# Altium PCB PCI Express Mini_3000X5095_52PIN_Full-Mini-Type F1.PCBDOC (part 6 of 7)
Units mm, origin at the board's own origin, x right, y up, seen from the top; angles counter-clockwise.
Board outline 70 x 83.2 mm, 6 copper layers (TopLayer, Layer 1, Layer 2, Layer 3, Layer 4, Bottom Layer), stack 1.013 mm thick; 332 components, 213 nets, 1105 pads, 528 vias.
Unrouted connection lines stored in the file: 10.
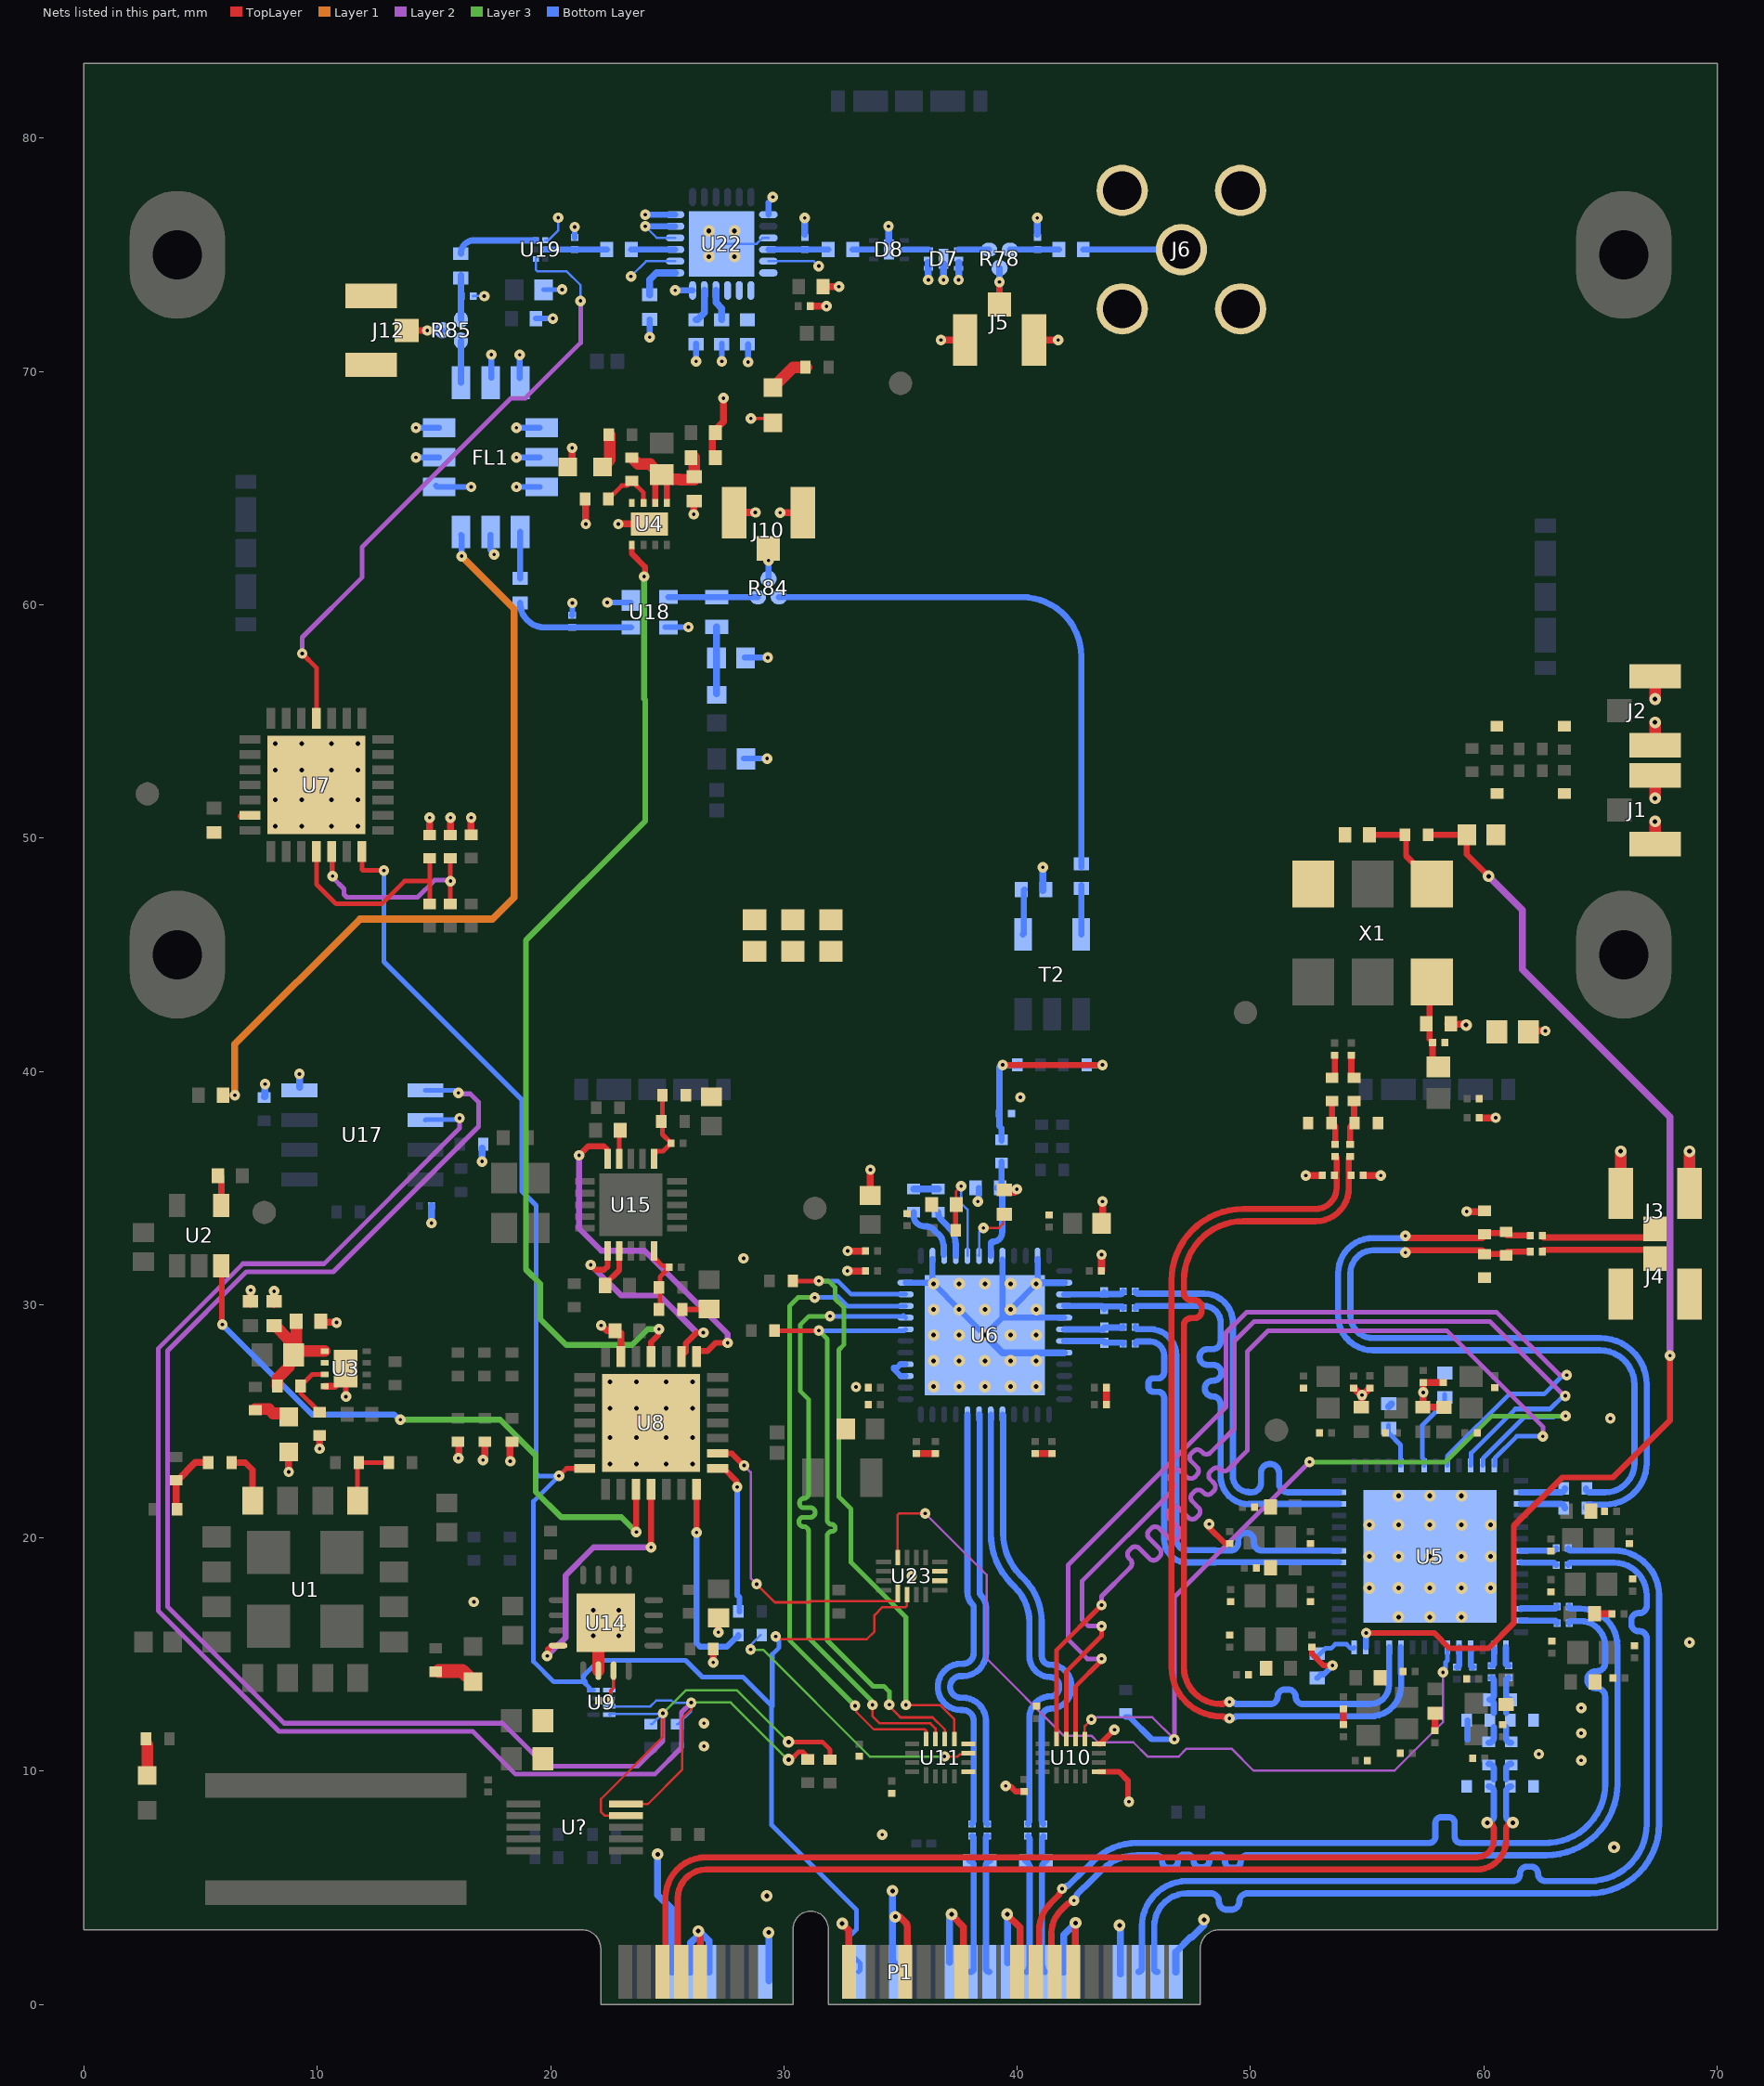
[diagram p7: the nets of this part, all layers, seen from the top]

## Via types
v1: diameter 0.45, hole 0.15, TopLayer to Bottom Layer, tented both sides, 263 vias
v2: diameter 0.5, hole 0.2, TopLayer to Bottom Layer, tented both sides, 200 vias
v3: diameter 0.5, hole 0.2, TopLayer to Bottom Layer, 36 vias
v4: diameter 0.45, hole 0.15, TopLayer to Bottom Layer, 29 vias

## Nets (pads, with @x,y where several pads share a name; then routed paths per layer and width w, separated by ;. In a path a pad name is that pad's centre, name@x,y a point inside that pad or via, vN(x,y) a via of type N, cw(c..) or ccw(c..) an arc to the next point about the centre after c; other vN are vias at no path point) (continued)
CLKin1_N: P1.5 R37.1 R39.1 | length 43.7
  TopLayer w0.267: P1.5@24.8,1.4 ccw(c24.8,1.526) 24.926,1.526 24.926,4.569 cw(c26.668,4.569) 26.668,6.311 59.69,6.311 ccw(c59.69,7.052) 60.431,7.052 60.431,7.511 ccw(c60.145,7.511) v2(60.145,7.798)
  Bottom Layer w0.267: v2(60.145,7.798) ccw(c60.145,8.084) 60.431,8.084 60.431,9.125 ccw(c60.21,9.125) R37.1@60.21,9.347 ; R39.1@60.21,10.316 cw(c60.21,10.096) 60.429,10.096 60.429,9.647
CLKin1_P: P1.7 R31.1 R32.2 | length 43.7
  TopLayer w0.267: P1.7@25.6,1.4 cw(c25.6,1.547) 25.453,1.547 25.453,4.569 cw(c26.668,4.569) 26.668,5.784 59.69,5.784 ccw(c59.69,7.052) 60.958,7.052 60.958,7.511 cw(c61.245,7.511) v2(61.245,7.798)
  Bottom Layer w0.267: 60.956,9.647 60.956,10.096 cw(c61.176,10.096) R31.1@61.176,10.316 ; R32.2@61.18,9.347 ccw(c61.18,9.125) 60.958,9.125 60.958,8.084 ccw(c61.245,8.084) v2(61.245,7.798)
CLKin1P_N: C59.2 R34.1 R38.1 R39.2 | length 2.6
  Bottom Layer w0.267: R39.2@60.21,11.216 ccw(c60.21,11.435) 60.429,11.435 60.429,11.889 ; C59.2@60.323,13.999 cw(c60.323,13.893) 60.429,13.893 60.429,13.253 cw(c60.243,13.253) 60.243,13.066 cw(c60.243,12.88) 60.429,12.88 60.429,12.489
CLKin1P_P: C54.2 R31.2 R33.2 R34.2 | length 2.6
  Bottom Layer w0.267: 60.956,11.889 60.956,11.435 ccw(c61.176,11.435) R31.2@61.176,11.216 ; 60.956,12.489 60.956,12.88 cw(c61.143,12.88) 61.143,13.066 cw(c61.143,13.253) 60.956,13.253 60.956,13.893 cw(c61.063,13.893) C54.2@61.063,13.999
CLKout1_C2_N: C58.1 J4.2 | length 5.1
  TopLayer w0.267: C58.1@62.504,32.272 cw(c62.579,32.272) 62.579,32.348 66.97,32.348 cw(c66.97,31.978) J4.2@67.34,31.978
CLKout1_C2_P: C57.1 J3.2 | length 5.1
  TopLayer w0.267: C57.1@62.507,32.964 ccw(c62.595,32.964) 62.595,32.875 66.97,32.875 ccw(c66.97,33.245) J3.2@67.34,33.245
CLKout1_C_N: C58.2 R36.2 R41.2 R42.2 | length 31.7
  TopLayer w0.267: R42.2@60.093,32.168 60.955,32.168 cw(c61.059,32.168) 61.059,32.272 C58.2@61.984,32.272
  TopLayer w0.268: v1(56.642,32.235) cw(c56.733,32.235) 56.733,32.326 59.873,32.326 cw(c59.873,32.162) R42.2@60.037,32.162
  Bottom Layer w0.267: 55.255,32.327 ccw(c55.255,31.354) 54.282,31.354 54.282,29.529 ccw(c55.244,29.529) 55.244,28.567 64.984,28.567 cw(c64.984,26.567) 66.984,26.567 66.984,23.209 cw(c65.204,23.209) 65.204,21.429 64.529,21.429 ccw(c64.529,21.274) R36.2@64.374,21.274
  Bottom Layer w0.268: 55.255,32.327 56.55,32.327 cw(c56.55,32.235) v1(56.642,32.235)
CLKout1_C_P: C57.2 R35.2 R40.2 R41.1 | length 31.8
  TopLayer w0.267: R40.2@60.037,33.068 60.955,33.068 ccw(c61.06,33.068) 61.06,32.964 C57.2@61.987,32.964
  TopLayer w0.268: v1(56.642,32.945) ccw(c56.733,32.945) 56.733,32.854 59.873,32.854 ccw(c59.873,33.018) R40.2@60.037,33.018
  Bottom Layer w0.267: 55.255,32.854 ccw(c55.255,31.354) 53.755,31.354 53.755,29.529 ccw(c55.244,29.529) 55.244,28.04 64.984,28.04 cw(c64.984,26.567) 66.457,26.567 66.457,23.209 cw(c65.204,23.209) 65.204,21.956 64.541,21.956 cw(c64.541,22.124) R35.2@64.374,22.124
  Bottom Layer w0.268: 55.255,32.854 56.55,32.854 ccw(c56.55,32.945) v1(56.642,32.945)
CLKout1_N: R36.1 U5.17 | length 2
  Bottom Layer w0.267: U5.17@61.593,21.456 63.291,21.456 cw(c63.291,21.274) R36.1@63.474,21.274
CLKout1_P: R35.1 U5.16 | length 2
  Bottom Layer w0.267: U5.16@61.593,21.956 63.306,21.956 ccw(c63.306,22.124) R35.1@63.474,22.124
CLKout3_C_N: C51.1 P1.48 | length 41.7
  Bottom Layer w0.267: P1.48@45.2,1.4 ccw(c45.2,1.545) 45.345,1.545 45.345,3.353 cw(c47.284,3.353) 47.284,5.292 61.109,5.292 61.242,5.292 ccw(c61.242,5.602) 61.552,5.602 cw(c61.862,5.602) 61.862,5.912 62.017,5.912 cw(c62.017,5.602) 62.327,5.602 ccw(c62.637,5.602) 62.637,5.292 64.541,5.292 ccw(c64.541,7.734) 66.984,7.734 66.984,15.561 66.984,15.695 ccw(c66.674,15.695) 66.674,16.005 66.635,16.005 cw(c66.635,16.315) 66.325,16.315 66.325,16.47 cw(c66.635,16.47) 66.635,16.78 66.674,16.78 ccw(c66.674,17.09) 66.984,17.09 66.984,17.533 ccw(c65.581,17.533) 65.581,18.936 63.72,18.936 ccw(c63.72,18.839) C51.1@63.624,18.839
CLKout3_C_P: C50.1 P1.50 | length 41.8
  Bottom Layer w0.267: P1.50@46,1.4 cw(c46,1.528) 45.872,1.528 45.872,3.353 cw(c47.284,3.353) 47.284,4.765 48.295,4.765 cw(c48.295,4.414) 48.645,4.414 ccw(c48.996,4.414) 48.996,4.064 49.171,4.064 ccw(c49.171,4.414) 49.522,4.414 cw(c49.872,4.414) 49.872,4.765 55.063,4.765 64.541,4.765 ccw(c64.541,7.734) 67.511,7.734 67.511,17.533 ccw(c65.581,17.533) 65.581,19.463 63.72,19.463 cw(c63.72,19.559) C50.1@63.624,19.559
CLKout3_N: C51.2 U5.22 | length 1.6
  Bottom Layer w0.267: U5.22@61.593,18.956 61.613,18.936 62.436,18.936 62.439,18.939 62.95,18.939 cw(c62.95,18.786) 63.059,18.895 63.104,18.849 C51.2@63.104,18.839
CLKout3_P: C50.2 U5.21 | length 1.6
  Bottom Layer w0.267: U5.21@61.593,19.456 62.22,19.456 62.224,19.46 62.95,19.46 ccw(c62.95,19.613) 63.059,19.504 63.104,19.549 C50.2@63.104,19.559
CLKout5_C_N: C192.1 P1.39 | length 39.9
  TopLayer w0.267: P1.39@41.6,1.4 cw(c41.93,1.73) 41.464,1.73 41.464,3.047 cw(c42.848,3.047) 41.869,4.026 42.15,4.307 cw(c42.218,4.239) 42.218,4.335
  Bottom Layer w0.267: v1(42.431,4.459) cw(c42.551,4.459) 42.466,4.543 v1@42.526,4.604 ; v1@42.526,4.604 ccw(c42.458,4.672) 42.555,4.672 cw(c42.651,4.672) 42.583,4.74 42.867,5.024 cw(c42.902,4.99) 42.902,5.039 43.643,5.779 cw(c45.138,4.284) 45.138,6.399 45.945,6.399 cw(c45.945,6.129) 46.214,6.129 ccw(c46.484,6.129) 46.484,5.86 46.618,5.86 ccw(c46.618,6.129) 46.888,6.129 46.888,6.159 cw(c47.157,6.159) 47.157,6.429 47.292,6.429 cw(c47.292,6.159) 47.561,6.159 ccw(c47.83,6.159) 47.83,5.89 47.965,5.89 ccw(c47.965,6.159) 48.234,6.159 cw(c48.504,6.159) 48.504,6.429 48.638,6.429 cw(c48.638,6.159) 48.908,6.159 48.908,6.129 ccw(c49.177,6.129) 49.177,5.86 49.312,5.86 ccw(c49.312,6.129) 49.581,6.129 cw(c49.851,6.129) 49.851,6.399 52.088,6.399 62.664,6.399 ccw(c62.664,9.466) 65.731,9.466 65.731,15.361 ccw(c64.126,15.361) 64.126,16.966 63.756,16.966 cw(c63.756,17.065) C192.1@63.658,17.065
CLKout5_C_P: C193.1 P1.37 | length 39.9
  TopLayer w0.267: P1.37@40.8,1.4 ccw(c40.47,1.73) 40.937,1.73 40.937,3.156 cw(c42.584,3.156) 41.419,4.322 41.777,4.68 ccw(c41.709,4.748) 41.806,4.748
  Bottom Layer w0.267: v1(41.929,4.961) ccw(c41.929,5.081) 42.013,4.996 v1@42.074,5.056 ; v1@42.074,5.056 cw(c42.142,4.988) 42.142,5.084 ccw(c42.142,5.181) 42.21,5.112 42.857,5.759 cw(c42.892,5.725) 42.892,5.774 43.272,6.154 cw(c45.135,4.292) 45.135,6.926 57.524,6.926 57.658,6.926 ccw(c57.658,7.193) 57.925,7.193 57.925,7.782 cw(c58.173,7.782) 58.173,8.03 58.503,8.03 cw(c58.503,7.782) 58.751,7.782 58.751,7.193 ccw(c59.018,7.193) 59.018,6.926 62.664,6.926 62.678,6.926 ccw(c62.664,9.466) 62.812,6.93 ccw(c62.664,9.466) 65.204,9.466 65.204,13.066 65.204,13.2 ccw(c64.842,13.2) 64.842,13.562 64.796,13.562 cw(c64.796,13.924) 64.796,14.286 64.842,14.286 ccw(c64.842,14.648) 65.204,14.648 65.204,15.361 ccw(c64.126,15.361) 64.126,16.439 63.756,16.439 ccw(c63.756,16.341) C193.1@63.658,16.341
CLKout5_N: C193.2 U5.27 | length 1.6
  Bottom Layer w0.267: U5.27@61.593,16.456 63.022,16.456 cw(c63.022,16.341) C193.2@63.138,16.341
CLKout5_P: C192.2 U5.26 | length 1.6
  Bottom Layer w0.267: U5.26@61.593,16.956 61.593,16.983 63.056,16.983 ccw(c63.056,17.065) C192.2@63.138,17.065
CLKout8_C_N: C53.1 R43.2 U6.18 | length 2.6
  Bottom Layer w0.268: U6.18@42.017,28.942 43.658,28.942 ccw(c43.658,29.017) R43.2@43.733,29.017 44.518,29.017 ccw(c44.518,29.046) C53.1@44.546,29.046
CLKout8_C_P: C52.1 R43.1 U6.19 | length 2.6
  Bottom Layer w0.268: U6.19@42.017,28.442 43.658,28.442 cw(c43.658,28.367) R43.1@43.733,28.367 44.504,28.367 cw(c44.504,28.326) C52.1@44.546,28.326
CLKout8_N: C53.2 U5.50 | length 18.5
  Bottom Layer w0.268: C53.2@45.066,29.046 ccw(c45.162,29.046) 45.162,28.95 45.694,28.95 cw(c45.694,27.815) 46.828,27.815 46.828,19.932 ccw(c47.286,19.932) 47.286,19.474 48.482,19.474 ccw(c48.5,19.474) 48.5,19.456 49.001,19.456 49.135,19.456 ccw(c49.135,19.793) 49.473,19.793 49.473,19.882 cw(c49.81,19.882) 50.147,19.882 50.147,19.793 ccw(c50.484,19.793) 50.484,19.456 51.948,19.456 U5.50@53.793,19.456
CLKout8_P: C52.2 U5.49 | length 18.5
  Bottom Layer w0.268: C52.2@45.066,28.326 cw(c45.162,28.326) 45.162,28.422 45.694,28.422 cw(c45.694,27.815) 46.3,27.815 46.3,27.108 cw(c46.032,27.108) 46.032,26.84 45.827,26.84 ccw(c45.827,26.64) 45.627,26.64 45.627,26.468 ccw(c45.827,26.468) 45.827,26.268 46.032,26.268 cw(c46.032,26) 46.3,26 46.3,25.365 46.3,19.932 ccw(c47.286,19.932) 47.286,18.946 48.482,18.946 48.482,18.956 U5.49@53.793,18.956
CLKout10_C_N: C56.1 R44.2 U6.16 | length 2.7
  Bottom Layer w0.268: U6.16@42.017,29.942 43.604,29.942 cw(c43.604,29.817) R44.2@43.729,29.817 cw(c43.837,29.817) 43.837,29.926 44.467,29.926 cw(c44.467,29.847) C56.1@44.546,29.847
CLKout10_C_P: C55.1 R44.1 U6.15 | length 2.7
  Bottom Layer w0.268: U6.15@42.017,30.442 43.634,30.442 ccw(c43.634,30.537) R44.1@43.729,30.537 ccw(c43.812,30.537) 43.812,30.454 44.433,30.454 ccw(c44.433,30.567) C55.1@44.546,30.567
CLKout10_N: C56.2 U5.54 | length 18.5
  Bottom Layer w0.268: C56.2@45.066,29.847 cw(c45.162,29.847) 45.162,29.943 48.01,29.943 cw(c48.01,29.237) 48.716,29.237 48.716,28.429 cw(c48.378,28.429) 48.378,28.092 48.151,28.092 ccw(c48.151,27.755) 48.151,27.417 48.408,27.417 cw(c48.408,27.08) 48.408,26.743 48.378,26.743 ccw(c48.378,26.406) 48.378,26.069 cw(c48.378,25.731) 48.716,25.731 48.716,24.381 48.716,22.651 ccw(c49.923,22.651) 49.923,21.443 49.923,21.456 U5.54@53.793,21.456
CLKout10_P: C55.2 U5.55 | length 18.2
  Bottom Layer w0.268: C55.2@45.066,30.567 ccw(c45.162,30.567) 45.162,30.471 48.01,30.471 cw(c48.01,29.237) 49.244,29.237 49.244,22.651 ccw(c49.923,22.651) 49.923,21.971 49.923,21.956 ; 49.924,21.956 50.058,21.956 ccw(c50.058,22.344) 50.446,22.344 50.446,22.786 cw(c50.834,22.786) 51.222,22.786 51.222,22.344 ccw(c51.61,22.344) 51.61,21.956 53.789,21.956 U5.55@53.793,21.956
CMLOUT_A_N: C64.2 P1.32 R82.1 | length 6.1
  Bottom Layer w0.267: C64.2@38.727,7.214 ccw(c38.727,7.141) 38.654,7.141 38.654,6.35 ccw(c38.84,6.35) 38.84,6.163 ccw(c38.84,5.986) 38.664,5.986 38.664,1.536 ccw(c38.8,1.536) P1.32@38.8,1.4
CMLOUT_A_P: C63.2 P1.30 R82.2 | length 6.1
  Bottom Layer w0.267: P1.30@38,1.4 ccw(c38,1.537) 38.137,1.537 38.137,5.967 ccw(c37.94,5.967) 37.94,6.163 ccw(c37.94,6.35) 38.127,6.35 38.127,7.153 ccw(c38.066,7.153) C63.2@38.066,7.214
CMLOUT_AC_N: C64.1 U6.31 | length 20.1
  Bottom Layer w0.267: U6.31@38.367,25.292 38.394,25.292 38.394,17.673 ccw(c38.604,17.673) 38.456,17.525 38.456,17.524 cw(c37.965,17.032) 38.66,17.032 38.66,16.926 ; 38.66,16.296 38.66,16.926 ; C64.1@38.727,7.734 cw(c38.888,7.895) 38.66,7.895 38.66,11.763 38.66,12.16 ccw(c37.669,12.16) 37.669,13.151 37.587,13.151 cw(c37.587,13.615) 37.587,14.078 37.669,14.078 ccw(c37.669,15.069) 38.66,15.069 38.66,16.926
CMLOUT_AC_P: C63.1 U6.32 | length 20.3
  Bottom Layer w0.267: U6.32@37.867,25.292 37.867,17.673 ccw(c38.603,17.673) 38.083,17.152 cw(c37.962,17.031) 38.133,17.031 38.133,16.926 ; C63.1@38.066,7.734 cw(c38.17,7.734) 38.097,7.807 ccw(c38.009,7.895) 38.133,7.895 38.133,11.763 38.133,12.16 ccw(c37.669,12.16) 37.669,12.624 37.587,12.624 cw(c37.587,13.615) 37.587,14.605 37.669,14.605 ccw(c37.669,15.069) 38.133,15.069 38.133,16.926 ; 38.133,16.078 38.133,16.926
CMLOUT_B_N: C61.2 P1.38 R81.1 | length 6
  Bottom Layer w0.267: C61.2@41.12,7.214 cw(c41.018,7.213) 41.09,7.141 ccw(c41.162,7.069) 41.061,7.069 41.061,6.447 ccw(c41.345,6.447) 41.144,6.246 41.213,6.177 ccw(c41.247,6.211) 41.247,6.163 ccw(c41.247,6.115) 41.213,6.149 41.144,6.08 ccw(c41.345,5.879) 41.061,5.879 41.061,4.637 41.063,4.634 41.063,1.73 ccw(c41.53,1.73) P1.38@41.2,1.4
CMLOUT_B_P: C60.2 P1.36 R81.2 | length 6
  Bottom Layer w0.267: P1.36@40.4,1.4 ccw(c40.07,1.73) 40.537,1.73 40.537,4.415 40.534,4.418 40.534,5.879 ccw(c40.249,5.879) 40.45,6.08 40.381,6.149 ccw(c40.347,6.115) 40.347,6.163 ccw(c40.347,6.211) 40.381,6.177 40.45,6.246 ccw(c40.249,6.447) 40.534,6.447 40.534,7.06 ccw(c40.316,7.06) 40.47,7.214 C60.2@40.46,7.214
CMLOUT_BC_N: C61.1 U6.29 | length 19.5
  Bottom Layer w0.268: U6.29@39.367,25.292 39.395,25.264 39.395,20.196 ccw(c41.935,20.196) 40.139,18.4 40.274,18.265 cw(c38.392,16.382) 41.054,16.382 41.054,16.336 41.054,14.935 ccw(c41.426,14.935) 41.426,14.563 cw(c41.426,13.662) 42.326,13.662 42.326,13.58 cw(c41.426,13.58) 41.426,12.68 ccw(c41.426,12.308) 41.054,12.308 41.054,10.555 41.054,7.894 ccw(c41.28,7.894) C61.1@41.12,7.734
CMLOUT_BC_P: C60.1 U6.30 | length 19.5
  Bottom Layer w0.268: U6.30@38.867,25.292 38.867,20.194 ccw(c41.931,20.194) 39.765,18.028 39.9,17.892 cw(c38.389,16.381) 40.526,16.381 40.526,16.336 40.526,14.935 ccw(c41.426,14.935) 41.426,14.035 cw(c41.426,13.662) 41.798,13.662 41.798,13.58 cw(c41.426,13.58) 41.426,13.208 ccw(c41.426,12.308) 40.526,12.308 40.526,10.555 40.526,7.894 cw(c40.401,7.894) 40.49,7.805 ccw(c40.561,7.734) C60.1@40.46,7.734
CTRL_VCXO: C38.1 R20.1 U5.41 | length 50.8
  TopLayer w0.25: v1(54.959,15.93) 57.873,15.93 58.536,15.267 60.195,15.267 61.287,16.358 61.287,20.522 63.356,22.592 65.532,22.592 67.979,25.039 v1(67.979,27.815) ; R20.1@57.569,50.14 C38.1@59.269,50.14 59.269,49.298 v2(60.202,48.364)
  Layer 2 w0.3: v2(60.202,48.364) 61.646,46.921 61.646,44.374 67.979,38.041 v1(67.979,27.815)
  Bottom Layer w0.25: U5.41@54.943,15.306 54.948,15.311 54.948,15.918 v1(54.959,15.93)
EN_2V8: U4.5 U8.4 | length 43
  TopLayer w0.25: U4.5@23.484,62.563 23.484,62.186 24.054,61.616 24.043,61.605 24.043,61.252 v1(24.004,61.214) ; U8.4@24.31,27.779 24.31,28.387 24.608,28.685 24.608,28.913 v1(24.646,28.951)
  Layer 3 w0.25: v1(24.004,61.214) 24.004,55.967 24.054,55.917 24.054,50.724 18.944,45.614 18.944,31.507 19.554,30.897 19.554,29.394 20.673,28.275 23.489,28.275 24.165,28.951 v1(24.646,28.951)
EN_5V: U2.3 U8.17 | length 26.7
  TopLayer w0.25: U2.3@5.888,31.658 5.908,31.638 5.908,29.166 v1(5.928,29.146) ; U8.17@23.66,22.079 23.668,22.072 23.668,20.257 v1(23.675,20.249)
  Layer 3 w0.25: v1(13.564,25.067) 17.839,25.067 19.358,23.548 19.358,21.99 20.457,20.891 23.033,20.891 v1(23.675,20.249)
  Bottom Layer w0.25: v1(5.928,29.146) 9.782,25.292 13.298,25.292 13.523,25.067 v1(13.564,25.067)
EN_I2C_TRANSLATOR: P1.18 U7.14 U8.14 U9.8 U23.2 | length 76.8
  TopLayer w0.1: v1@29.754,15.777 29.754,15.769 29.814,15.71 29.821,15.71 29.874,15.657 33.556,15.657 33.88,15.981 33.88,16.687 34.232,17.039 35.218,17.039 35.277,17.098 U23.2@35.277,17.564
  TopLayer w0.2: U7.14@11.925,49.392 11.925,48.643 11.942,48.626 12.835,48.626 v1(12.854,48.606) ; v1(20.362,22.659) 20.682,22.979 U8.14@21.46,22.979
  Bottom Layer w0.2: v1(12.854,48.606) 12.854,44.697 18.767,38.784 18.767,34.867 19.38,34.254 19.38,22.776 19.498,22.659 v1(20.362,22.659) ; v1@20.323,22.62 19.27,21.567 19.27,14.699 20.133,13.836 21.409,13.836 21.679,13.566 21.679,13.481 U9.8@21.844,13.481 ; 21.49,13.836 21.409,13.916 21.409,14.082 22.083,14.756 25.787,14.756 26.503,14.04 28.242,14.04 29.5,12.781 ; v1@29.794,15.659 29.794,15.3 29.5,15.006 29.5,12.781 ; P1.18@33.2,1.4 33.274,1.474 33.274,1.772 32.8,2.246 32.8,2.907 33.112,3.219 33.112,4.056 29.471,7.697 29.471,12.753 29.5,12.781
  other v1: 29.653,15.777
EN_LMK_1V8: U8.2 U15.6 | length 9.2
  TopLayer w0.25: v1(21.717,31.701) 21.734,31.701 21.938,31.496 22.299,31.496 22.445,31.643 U15.6@22.445,32.304 ; U8.2@25.61,27.779 25.8,27.969 25.8,28.343 26.255,28.798 v1(26.55,28.798)
  Layer 2 w0.25: v1(21.717,31.701) 23.023,30.395 24.672,30.395 26.268,28.798 v1(26.55,28.798)
EN_LMK_3V3: U8.1 U15.20 | length 15.3
  TopLayer w0.25: v1(21.223,36.4) 21.611,36.788 22.284,36.788 22.43,36.642 22.43,36.269 U15.20@22.445,36.254 ; U8.1@26.26,27.779 26.26,27.957 26.32,28.017 26.723,28.017 27.068,28.362 v1(27.592,28.362)
  Layer 2 w0.25: v1(21.223,36.4) 21.223,33.262 22.17,32.315 24.02,32.315 27.592,28.743 v1(27.592,28.362)
EN_LMK_SPI: R87.2 U8.22 | length 6.7
  TopLayer w0.25: U8.22@27.16,22.979 27.425,22.979 27.971,22.433 27.971,22.211 v1(28,22.183)
  Bottom Layer w0.25: v1(28,22.183) 28,17.548 28.1,17.448 R87.2@28.1,16.852
EN_LTC_SPI: R13.2 U8.21 | length 8.7
  TopLayer w0.25: v1(26.26,20.233) U8.21@26.26,22.079
  Bottom Layer w0.25: v1(26.26,20.233) 26.26,15.491 26.407,15.344 27.558,15.344 27.9,15.686 27.95,15.686 28.05,15.786 R13.2@28.05,15.836
EN_POWER_LTC2122: U8.18 U14.4 | length 11.2
  TopLayer w0.25: v1(19.855,14.942) 19.883,14.97 19.883,15.219 20.048,15.384 U14.4@20.323,15.384 ; v1(24.31,19.594) U8.18@24.31,22.079
  Layer 2 w0.25: v1(19.855,14.942) 20.641,15.728 20.641,18.393 21.841,19.594 v1(24.31,19.594)
GND: C7.1 C8.1 C9.1 C14.2 C15.2 C35.1 C36.1 C37.1 C38.2 C39.2 C45.1 C65.1 C66.1 C67.1 C68.1 C70.2 C71.2 C73.1 C74.1 C75.1 C76.1 C77.1 C78.1 C79.1 C80.1 C81.1 C82.1 C83.1 C84.1 C85.1 C86.1 C87.1 C88.1 C89.1 C90.1 C92.2 C93.1 C94.1 C95.1 C96.1 C97.1 C98.1 C99.1 C100.1 C101.1 C102.1 C103.1 C104.1 C105.1 C106.1 C107.1 C108.1 C109.1 C110.1 C113.1 C114.1 C115.1 C116.1 C117.1 C118.1 C119.1 C120.1 C121.1 C122.1 C123.1 C124.1 C125.1 C126.1 C127.1 C128.1 C129.1 C131.1 C132.1 C133.1 C134.1 C135.1 C136.1 C137.1 C138.1 C141.1 C143.1 C144.1 C145.1 C146.1 C147.1 C148.1 C149.1 C150.1 C154.1 C179.1 D12.2 FB15.2 FB30.2 FB31.2 FB32.1 FB33.1 FB34.1 J1.1 J1.3 J2.1 J2.3 J3.1 J3.3 J4.1 J4.3 P1.6 P1.8 P1.9 P1.10 P1.16 P1.17 P1.22 P1.23 P1.28 P1.29 P1.34 P1.35 P1.40 P1.41 P1.46 P1.52 R7.1 R16.1 R18.1 R19.2 R23.1 R25.1 R26.1 R28.2 R29.2 R32.1 R33.1 R37.2 R38.2 R40.1 R42.1 R60.1 R61.1 R62.1 R72.1 R73.1 R74.1 R99.1 R101.1 R103.2 R114.1 R115.1 U3.4 U3.9 U5.57 U6.2 U6.8 U6.11 U6.14 U6.17 U6.20 U6.39 U6.40 U6.47 U6.49 U7.6 U7.29 U8.6 U8.29 U9.1 U10.5 U10.8 U11.5 U11.8 U14.6 U14.17 U17.4 U23.6 U23.7 | length 115
  TopLayer w0.25: v1(11.229,26.059) U3.9@11.229,26.963 ; R103.2@25.596,29.791 26.764,29.791 C141.1@26.788,29.815 ; C74.1@39.449,34.785 39.819,34.785 ccw(c39.819,34.947) v1(39.981,34.947) ; v1@39.722,9.342 39.934,9.13 C70.2@40.287,9.13 ; U10.5@43.495,9.979 44.367,9.979 44.751,9.595 44.751,8.73 v1(44.789,8.692) ; U10.8@43.495,11.179 43.573,11.179 v1(44.169,11.775) ; v1(48.228,20.592) 48.228,20.443 48.897,19.774 49.097,19.774 49.122,19.749 C135.1@49.112,19.749 ; C119.1@52.634,15.316 52.634,15.032 53.136,14.53 v1(53.52,14.53) ; C149.1@56.534,14.263 C149.1@56.534,14.273
  TopLayer w0.3: U7.6@6.743,50.942 7.082,50.942 U7.6@7.117,50.977 ; C9.1@7.134,30.01 7.14,30.015 7.14,30.615 v1(7.145,30.621) ; C8.1@8.152,30.01 v1@8.152,30.574 ; v1(8.776,22.829) D12.2@8.776,23.689 ; C7.1@10.016,29.282 10.045,29.252 10.809,29.252 v1(10.828,29.233) ; v1(10.102,23.827) R7.1@10.102,24.439 ; U3.4@10.316,26.507 10.758,26.507 10.858,26.607 10.866,26.607 11.216,26.957 U3.9@11.216,27.257 ; R60.1@14.818,50.082 v1(14.818,50.879) ; R61.1@15.707,50.082 v1(15.707,50.879) ; v1@16.063,23.354 R74.1@16.063,24.118 ; R62.1@16.596,50.082 v1(16.596,50.879) ; v1(17.103,23.341) 17.184,23.422 R73.1@17.184,24.108 ; R72.1@18.267,24.099 18.267,23.297 v1(18.273,23.291) ; v1(22.17,29.109) 22.197,29.109 22.41,28.896 22.77,28.896 22.79,28.876 22.895,28.876 23.01,28.761 U8.6@23.01,27.779 ; v2(26.332,3.15) 26.423,3.059 26.423,1.423 P1.9@26.4,1.4 ; v1(26.969,14.666) R99.1@26.969,15.353 ; v1(27.194,15.957) C75.1@27.194,16.644 ; v2(32.502,3.472) 32.786,3.187 P1.17@32.786,1.4 ; v1(32.721,31.442) C84.1@33.407,31.442 ; v1(32.732,32.3) C79.1@33.418,32.3 ; C87.1@33.705,34.763 v1(33.705,35.787) ; v2(34.774,3.76) 34.971,3.76 35.253,3.478 cw(c34.981,3.353) 35.281,3.353 P1.23@35.281,1.407 ; C90.1@35.677,23.617 C179.1@36.492,23.617 ; v2(37.191,3.869) 37.191,3.832 37.693,3.33 P1.29@37.693,1.408 ; v2(39.569,3.868) 39.569,3.848 40.12,3.298 P1.35@40.12,1.415 ; C89.1@40.779,23.617 C88.1@41.492,23.617 C88.1@41.496,23.617 ; P1.41@42.488,1.422 42.488,3.479 v2(42.502,3.493) ; C78.1@43.616,31.444 v1(43.616,32.139) ; C76.1@43.658,33.532 v1(43.658,34.419) ; C80.1@43.832,25.723 C85.1@43.832,26.442 ; v1(52.375,35.536) C39.2@53.073,35.536 ; C98.1@53.978,11.994 C99.1@53.978,12.674 ; C106.1@54.42,26.421 54.43,26.421 54.702,26.149 54.725,26.149 54.765,26.109 54.765,25.615 C108.1@54.754,25.603 ; v1(54.777,26.12) 54.8,26.12 55.109,26.429 C102.1@55.119,26.429 ; C45.1@54.833,35.536 v1(55.584,35.536) ; C147.1@57.909,11.745 C150.1@57.909,12.616 ; C94.1@58.262,26.653 C101.1@57.398,26.653 57.398,25.603 C104.1@57.383,25.603 57.383,25.598 C96.1@58.285,25.598 ; v1(59.269,33.989) R40.1@59.955,33.989 ; C109.1@59.821,38.01 v1(60.507,38.01) ; FB15.2@61.95,41.735 v1(62.636,41.735) ; C134.1@64.609,16.751 C131.1@65.489,16.751
  TopLayer w0.5: U14.6@22.048,14.309 22.048,16.034 U14.17@22.373,16.359 ; J3.1@65.865,34.77 v2@65.866,36.572 ; J1.3@67.34,49.821 v2(67.34,50.708) ; v2(67.34,51.708) J1.1@67.34,52.595 ; J2.3@67.34,54.073 v2(67.34,54.96) ; v2(67.34,55.96) J2.1@67.34,56.847 ; J3.3@68.815,34.77 v2(68.815,36.572)
  Bottom Layer w0.25: U6.39@35.217,26.942 35.008,26.942 34.699,27.252 34.699,27.296 34.846,27.296 34.992,27.442 U6.40@35.217,27.442 ; U6.47@35.217,30.942 U6.49@36.367,30.942 ; U6.2@36.367,31.967 U6.49@36.367,30.942 ; v1(38.318,34.419) ccw(c38.318,34.454) 38.353,34.454 C65.1@38.353,35.004 ; U6.8@39.367,31.93 U6.49@39.367,29.442 ; U6.11@40.88,31.96 40.88,30.955 v2(39.717,29.792) U6.49@39.367,29.442 ; U6.17@42.017,29.442 U6.49@39.367,29.442 ; C35.1@52.861,13.994 53.011,14.144 53.134,14.144 v1(53.52,14.53) ; 59.31,11.351 R38.2@59.31,12.189 ; U6.49@36.367,30.942 v2(36.417,30.892) v2(37.517,29.792) v2(38.617,28.692) U6.49@39.367,29.442
  Bottom Layer w0.3: R114.1@7.739,38.919 7.746,38.927 7.746,39.439 v1(7.765,39.457) ; U17.4@9.237,39.322 v1(9.237,39.886) ; v1(14.893,33.492) 14.897,33.495 C154.1@14.897,34.231 ; v1(17.061,36.136) R115.1@17.06,36.7 ; v2(24.59,6.444) 24.59,4.7 25.2,4.09 P1.6@25.2,1.4 ; P1.8@26,1.4 26,2.638 26.332,2.97 v2(26.332,3.15) 26.379,3.15 26.8,2.728 P1.10@26.8,1.4 ; v2(29.343,3.09) 29.357,3.076 P1.16@29.357,1.019 ; v2(34.658,4.871) 34.658,1.863 P1.22@34.724,1.796 ; R16.1@35.564,34.963 R18.1@36.613,34.963 ; P1.28@37.107,1.803 37.107,3.785 v2(37.191,3.869) ; v2(38.617,28.692) 39.367,27.942 U6.20@42.017,27.942 ; v2(39.569,3.868) 39.583,3.854 P1.34@39.583,1.796 ; U6.49@40.892,30.942 U6.14@42.017,30.942 ; P1.40@42,1.4 42,2.991 v2(42.502,3.493) ; v2(44.384,3.391) 44.427,3.349 P1.46@44.427,1.32 ; P1.52@46.8,1.4 46.8,2.25 47.433,2.883 47.481,2.883 48.006,3.408 v2(48.006,3.632) ; C37.1@55.918,25.622 55.918,25.627 56.038,25.747 C37.1@56.043,25.747
  other v1: 34.214,7.285 39.506,9.369 64.175,10.463 62.361,10.73 26.579,11.069 64.175,11.63 26.579,12.057 64.175,12.714 68.815,15.523 16.711,17.261 35.477,18.364 16.053,23.419 65.422,25.123 57.408,26.238 33.088,26.474 8.153,30.574 40.134,38.884
  other v2: 29.268,4.655 65.581,6.742 21.823,15.809 22.923,15.809 56.343,16.606 57.693,16.606 59.043,16.606 21.823,16.909 22.923,16.909 55.093,17.856 56.343,17.856 57.693,17.856 59.043,17.856 60.293,17.856 55.093,19.206 56.343,19.206 57.693,19.206 59.043,19.206 60.293,19.206 55.093,20.556 56.343,20.556 57.693,20.556 59.043,20.556 60.293,20.556 56.343,21.806 57.693,21.806 59.043,21.806 36.417,26.492 37.517,26.492 38.617,26.492 39.717,26.492 40.817,26.492 36.417,27.592 37.517,27.592 38.617,27.592 39.717,27.592 40.817,27.592 36.417,28.692 37.517,28.692 39.717,28.692 40.817,28.692 36.417,29.792 38.617,29.792 40.817,29.792 37.517,30.892 38.617,30.892 39.717,30.892 40.817,30.892 65.866,36.572
  other v3: 22.54,23.159 23.675,23.159 24.945,23.159 26.08,23.159 22.54,24.294 23.675,24.294 24.945,24.294 26.08,24.294 22.54,25.564 23.675,25.564 24.945,25.564 26.08,25.564 22.54,26.699 23.675,26.699 24.945,26.699 26.08,26.699 8.197,50.507 9.332,50.507 10.602,50.507 11.737,50.507 8.197,51.642 9.332,51.642 10.602,51.642 11.737,51.642 8.197,52.912 9.332,52.912 10.602,52.912 11.737,52.912 8.197,54.047 9.332,54.047 10.602,54.047 11.737,54.047
  other v4: 28.272,31.98
GND_ATT: C4.1 C11.1 C12.1 C13.1 C48.1 C49.2 C158.1 C161.2 C162.2 C165.1 C166.1 C168.2 C180.1 C181.1 C182.2 C183.2 C184.2 C185.2 C186.1 C187.1 D7.2 D7.3 D7.4 D7.5 D7.7 D8.7 D10.2 D13.2 FB32.2 FB33.2 FB34.2 FL1.1 FL1.2 FL1.3 FL1.5 FL1.6 FL1.7 FL1.8 FL1.9 FL1.11 FL1.12 J5.1 J5.3 J6.MH J10.1 J10.3 J12.1 J12.3 R9.1 U4.4 U4.9 U18.2 U18.4 U19.4 U22.1 U22.3 U22.5 U22.12 U22.14 U22.16 U22.17 U22.18 U22.25 | length 85
  TopLayer w0.15: v1(28.587,67.989) 29.331,67.989 29.525,67.795 D10.2@29.525,67.805
  TopLayer w0.2: C4.1@5.884,38.978 C4.1@5.959,38.978 v1@6.465,38.978
  TopLayer w0.3: D13.2@20.657,65.9 20.924,66.167 v1(20.924,66.719) ; R9.1@21.47,64.516 21.51,64.477 v1(21.51,63.463) ; v1(22.905,63.463) U4.9@23.903,63.463 ; U4.9@23.934,63.463 U4.9@24.234,63.463 ; v1(26.134,63.874) 26.14,63.879 C11.1@26.14,64.549 ; C12.1@26.932,66.306 C13.1@26.932,67.381 ; C13.1@26.939,67.381 27.407,67.849 v1(27.407,68.857) ; J10.1@27.862,63.944 27.875,63.957 v1(28.778,63.957) ; v1(29.837,63.944) J10.3@30.812,63.944 ; C180.1@31.14,72.796 v1(31.826,72.796) ; C181.1@31.673,73.635 v1(32.36,73.635) ; v1(36.729,71.345) 37.727,71.345 J5.3@37.73,71.342 ; J5.1@40.756,71.349 40.76,71.345 v1(41.757,71.345)
  Layer 2 w0.3: v1@28.753,63.932 v1(28.778,63.957)
  Layer 1 w0.3: v1(6.466,38.977) 6.466,41.166 11.826,46.527 17.511,46.527 18.44,47.456 18.44,59.834 v1(16.191,62.083)
  Bottom Layer w0.1: C48.1@16.681,73.225 16.689,73.233 v1(17.158,73.233) ; U19.4@19.765,75.621 19.905,75.621 20.324,76.04 v1(20.324,76.594) ; v1(23.445,74.075) 24.095,74.725 U22.14@25.337,74.725 ; v1(24.055,76.225) 24.555,75.725 U22.16@25.337,75.725 ; U22.25@27.337,75.475 28.837,75.475 29.087,75.725 U22.3@29.337,75.725 ; U22.5@29.337,74.725 31.288,74.725 v1(31.495,74.517)
  Bottom Layer w0.2: C165.1@19.699,73.503 20.49,73.503 v1(20.499,73.512)
  Bottom Layer w0.25: v1(14.226,66.319) FL1.8@15.224,66.319 ; v1(14.226,67.589) FL1.9@15.224,67.589 ; FL1.7@15.092,65.1 15.143,65.049 v1(16.596,65.049) ; FL1.6@16.161,63 16.191,62.97 v1(16.191,62.083) ; FL1.5@17.424,63 17.424,62.349 17.578,62.195 v1(17.578,62.155) ; FL1.11@17.466,69.725 v1(17.466,70.723) ; v1(18.534,65.049) FL1.3@19.533,65.049 ; v1(18.534,66.319) FL1.2@19.533,66.319 ; v1(18.534,67.588) 19.532,67.588 FL1.1@19.533,67.589 ; FL1.12@18.672,69.715 v1(18.672,70.714) ; C166.1@19.374,72.27 v1(20.099,72.27) ; C49.2@20.924,59.55 20.93,59.556 20.93,60.073 v1(20.936,60.079) ; C168.2@21.031,75.745 v1(21.031,76.195) ; v1(22.431,60.098) U18.2@23.43,60.098 ; v1(24.055,76.225) U22.17@25.337,76.225 ; v1(24.055,76.725) U22.18@25.337,76.725 ; v1(24.245,71.47) C182.2@24.245,72.235 ; U18.4@24.912,59.045 v1(25.91,59.045) ; v1(25.337,73.475) U22.12@26.102,73.475 ; v1(26.237,70.434) C183.2@26.237,71.199 ; v1(27.342,70.434) C184.2@27.342,71.199 ; C161.2@28.285,53.408 v1(29.284,53.408) ; C162.2@28.312,57.734 v1(29.31,57.734) ; v1(28.467,70.406) C185.2@28.467,71.171 ; U22.1@29.337,76.725 29.337,77.246 29.525,77.434 v1(29.525,77.475)
  Bottom Layer w0.3: 30.897,75.895 v1(30.897,76.582) ; D8.7@34.485,75.538 v1(34.485,76.225) ; v1(36.19,73.929) D7.4@36.19,74.425 36.19,74.676 ; v1(36.84,73.929) D7.7@36.84,74.615 ; v1(37.49,73.929) D7.3@37.49,74.425 37.49,74.676 ; 40.863,75.895 v1(40.863,76.582) ; C158.1@41.097,47.745 v1(41.097,48.743)
  other v3: 26.787,74.925 27.887,74.925 26.787,76.025 27.887,76.025
GND_VCXO: C42.1 C111.1 C112.1 FB15.1 X1.3 | length 0.8
  TopLayer w0.3: C112.1@58.453,42.044 58.483,42.014 59.214,42.014 v2(59.244,41.984)
GS_TETRA: U7.25 U19.1 | length 26.8
  TopLayer w0.2: v1(9.352,57.912) 9.967,57.297 U7.25@9.967,55.127
  Layer 2 w0.2: v1(9.352,57.912) 9.352,58.603 11.917,61.167 11.917,62.463 18.311,68.857 18.916,68.857 21.285,71.226 v1(21.285,73.025)
  Bottom Layer w0.1: U19.1@19.367,74.859 U19.1@19.367,74.825 19.367,74.359 19.425,74.3 20.683,74.3 21.285,73.698 v1(21.285,73.025)
I2C_SCL: R66.1 R71.2 U9.3 U17.6 U?.5 | length 75.3
  TopLayer w0.1: U?.5@23.227,8.594 24.173,8.594 25.646,10.068 25.646,12.258 26.025,12.637 v1(26.025,12.936)
  TopLayer w0.2: v2(30.2,10.495) 30.302,10.495 30.636,10.829 30.815,10.829 31.025,10.62 R71.2@31.025,10.504 R71.2@31.025,10.454
  Layer 2 w0.2: v1(16.101,37.991) 16.101,37.56 10.294,31.754 6.817,31.754 3.181,28.118 3.181,16.885 8.359,11.707 16.664,11.707 18.5,9.87 24.472,9.87 25.61,11.009 25.61,12.521 v1(26.025,12.936)
  Layer 3 w0.1: v1@25.983,12.944 27.72,12.944 30.169,10.495 v2(30.2,10.495)
  Bottom Layer w0.1: U9.3@22.514,12.781 24.278,12.781 24.528,13.031 25.182,13.031 25.277,12.936 v1(26.025,12.936) 26.025,12.566 25.479,12.019 R66.1@25.429,12.019
  Bottom Layer w0.2: U17.6@14.637,37.914 14.654,37.931 16.101,37.931 v1(16.101,37.991)
I2C_SDA: R65.1 R70.2 U9.4 U17.5 U?.4 | length 76.3
  TopLayer w0.1: U?.4@23.227,8.094 22.327,8.094 22.167,8.254 22.167,8.815 24.814,11.461 v1(24.814,12.484)
  TopLayer w0.2: v2(30.2,11.255) 31.645,11.255 31.982,10.918 R70.2@31.982,10.441
  Layer 2 w0.2: v1(16.054,39.074) 16.092,39.036 16.56,39.036 16.916,38.679 16.916,37.63 10.69,31.404 6.962,31.404 3.581,28.024 3.581,17.05 8.575,12.057 17.948,12.057 19.784,10.22 23.748,10.22 24.814,11.287 v1(24.814,12.484)
  Layer 3 w0.1: v1(24.814,12.484) 25.802,13.471 27.984,13.471 v2(30.2,11.255)
  Bottom Layer w0.1: U9.4@22.563,12.382 U9.4@22.514,12.431 22.54,12.458 v1@24.788,12.458 ; R65.1@24.3,12.019 24.35,12.019 v1@24.788,12.458 ; v1(24.814,12.484) v1@24.788,12.458
  Bottom Layer w0.2: U17.5@14.637,39.184 14.639,39.181 16.088,39.181 16.088,39.109 v1(16.054,39.074)
LMK_CLKin0_N: C46.1 U5.33 | length 0.9
  Bottom Layer w0.267: C46.1@58.847,14.465 ccw(c58.847,14.56) 58.943,14.56 U5.33@58.943,15.306
LMK_CLKin0_P: C47.1 U5.32 | length 0.8
  Bottom Layer w0.267: U5.32@59.443,15.247 59.443,14.56 ccw(c59.538,14.56) C47.1@59.538,14.465
LMK_CLKin1_N: C59.1 U5.30 | length 0.8
  Bottom Layer w0.267: C59.1@60.323,14.519 ccw(c60.323,14.639) 60.443,14.639 U5.30@60.443,15.247
LMK_CLKin1_P: C54.1 U5.29 | length 0.9
  Bottom Layer w0.267: U5.29@60.943,15.306 60.943,14.639 ccw(c61.063,14.639) C54.1@61.063,14.519
LMK_CLKsel: U5.34 U23.12 | length 36.3
  TopLayer w0.1: U23.12@34.877,19.164 34.877,20.99 34.935,21.049 v1(36.059,21.049)
  Layer 2 w0.1: v1(36.059,21.049) 38.693,18.415 38.693,14.825 41.99,11.528 43.18,11.528 43.468,11.24 44.157,11.24 44.98,11.24 45.587,10.633 46.93,10.633 47.262,10.966 49.189,10.966 50.127,10.028 56.173,10.028 58.249,12.104 v1(58.249,14.239)
  Bottom Layer w0.2: v1(58.249,14.239) 58.249,14.307 58.364,14.422 58.364,14.665 58.443,14.744 U5.34@58.443,15.306
LMK_CLKsel_3V3: U8.23 U23.1 | length 13.3
  TopLayer w0.1: v1(28.837,18.019) 29.617,17.239 31.084,17.239 31.134,17.289 34.827,17.289 34.877,17.339 U23.1@34.877,17.614
  TopLayer w0.25: U8.23@27.16,23.629 27.166,23.624 27.774,23.624 v1(28.294,23.104)
  Layer 2 w0.1: v1(28.294,23.104) 28.58,22.817 28.58,18.276 v1(28.837,18.019)
LMK_OSC_IN_N: C39.1 C41.1 U5.38 | length 40.9
  TopLayer w0.267: v1(49.097,12.261) ccw(c49.012,12.177) 49.012,12.296 48.927,12.296 cw(c48.927,12.393) 48.859,12.325 ccw(c48.791,12.256) 48.791,12.353 48.727,12.353 cw(c48.727,14.465) 46.615,14.465 46.615,31.035 cw(c49.682,31.035) 49.682,34.102 52.789,34.102 ccw(c52.789,35.002) 53.689,35.002 53.689,35.44 ccw(c53.593,35.44) C39.1@53.593,35.536 ccw(c53.593,35.632) 53.689,35.632 53.689,36.296 ccw(c53.632,36.296) C41.1@53.632,36.353
  Bottom Layer w0.267: v1(49.097,12.261) cw(c49.182,12.177) 49.182,12.296 49.267,12.296 ccw(c49.267,12.393) 49.335,12.325 cw(c49.403,12.256) 49.403,12.353 55.136,12.353 ccw(c55.136,13.673) 56.456,13.673 56.456,14.187 56.443,14.2 U5.38@56.443,15.306
LMK_OSC_IN_P: C44.1 C45.2 U5.39 | length 40.9
  TopLayer w0.267: v1(49.097,12.971) cw(c49.012,13.056) 49.012,12.936 48.927,12.936 ccw(c48.927,12.84) 48.859,12.908 cw(c48.791,12.976) 48.791,12.88 48.727,12.88 cw(c48.727,14.465) 47.142,14.465 47.142,28.204 47.142,29.113 cw(c47.452,29.113) 47.452,29.423 47.593,29.423 ccw(c47.593,29.733) 47.903,29.733 47.903,29.888 ccw(c47.593,29.888) 47.593,30.198 47.452,30.198 cw(c47.452,30.508) 47.142,30.508 47.142,31.035 cw(c49.682,31.035) 49.682,33.575 52.789,33.575 ccw(c52.789,35.002) 54.216,35.002 54.216,35.44 cw(c54.313,35.44) C45.2@54.313,35.536 cw(c54.313,35.632) 54.216,35.632 54.216,36.299 cw(c54.271,36.299) C44.1@54.271,36.353
  Bottom Layer w0.267: v1(49.097,12.971) ccw(c49.182,13.056) 49.182,12.936 49.267,12.936 cw(c49.267,12.84) 49.335,12.908 ccw(c49.403,12.976) 49.403,12.88 50.718,12.88 50.852,12.88 ccw(c50.852,13.19) 51.162,13.19 cw(c51.472,13.19) 51.472,13.5 51.627,13.5 cw(c51.627,13.19) 51.937,13.19 ccw(c52.247,13.19) 52.247,12.88 52.843,12.88 55.136,12.88 ccw(c55.136,13.673) 55.929,13.673 55.929,14.187 55.943,14.2 U5.39@55.943,15.306
LMK_SPI_CLK: U5.13 U10.12 | length 44.5
  TopLayer w0.2: U10.12@41.695,11.379 41.695,15.199 v4(43.616,17.12)
  Layer 2 w0.2: v4(43.616,17.12) 43.616,17.498 44.779,18.66 44.849,18.731 ccw(c44.678,18.903) 44.849,19.074 44.798,19.125 cw(c44.97,19.297) 44.798,19.469 44.884,19.554 cw(c45.055,19.383) 45.227,19.554 45.672,19.109 ccw(c45.844,19.28) 46.016,19.109 46.101,19.194 ccw(c45.93,19.366) 46.101,19.537 45.656,19.983 cw(c45.827,20.155) 45.656,20.326 45.741,20.412 cw(c45.913,20.24) 46.084,20.412 46.53,19.966 ccw(c46.702,20.138) 46.873,19.966 46.959,20.052 ccw(c46.787,20.223) 46.959,20.395 46.513,20.841 cw(c46.685,21.012) 46.513,21.184 46.599,21.269 cw(c46.77,21.098) 46.942,21.269 47.339,20.873 ccw(c47.51,21.044) 47.682,20.873 47.767,20.959 ccw(c47.596,21.13) 47.767,21.302 47.507,21.562 cw(c47.679,21.733) 47.507,21.905 47.593,21.99 cw(c47.765,21.819) 47.936,21.99 47.999,21.927 ccw(c48.171,22.099) 48.342,21.927 48.428,22.013 ccw(c48.256,22.185) 48.428,22.356 48.28,22.505 cw(c48.451,22.676) 48.28,22.848 48.365,22.933 cw(c48.537,22.762) 48.708,22.933 ccw(c48.88,23.105) 49.051,22.933 49.855,23.737 49.855,27.98 50.762,28.887 58.412,28.887 62.531,24.768 v4(62.531,24.354)
  Bottom Layer w0.2: U5.13@60.443,23.106 60.463,23.126 60.463,23.407 61.41,24.354 v4(62.531,24.354)
LMK_SPI_CS: R12.1 U5.12 U10.9 | length 38.1
  TopLayer w0.1: U10.9@42.895,11.379 42.895,11.935 v4(43.182,12.222)
  Layer 2 w0.1: v4(43.182,12.222) 43.249,12.288 43.393,12.288 43.415,12.31 45.796,12.31 v1(46.736,11.37)
  Layer 2 w0.2: v1(46.736,11.37) 46.736,17.458 v1(52.532,23.254)
  Layer 3 w0.2: v1(52.532,23.254) 58.362,23.254 60.334,25.227 v4(63.5,25.227)
  Bottom Layer w0.2: U5.12@59.943,23.106 59.963,23.126 59.963,23.41 61.729,25.177 62.986,25.177 63.036,25.227 v4(63.5,25.227)
  Bottom Layer w0.25: R12.1@44.65,12.323 44.813,12.323 45.766,11.37 v1(46.736,11.37)
LMK_SPI_MISO: U5.9 U10.10 | length 44.7
  TopLayer w0.2: U10.10@42.495,11.379 42.495,13.63 43.616,14.75 v4(43.616,14.82)
  Layer 2 w0.2: v4(43.616,14.82) 43.008,14.82 42.176,15.652 42.176,18.835 48.948,25.607 48.948,28.797 49.821,29.67 60.554,29.67 63.231,26.993 63.536,26.993 v4(63.555,26.975)
  Bottom Layer w0.2: U5.9@58.443,23.106 58.443,23.509 61.099,26.166 62.582,26.166 63.391,26.975 v4(63.555,26.975)
LMK_SPI_MOSI: U5.11 U10.11 | length 44.4
  TopLayer w0.2: U10.11@42.095,11.379 42.095,14.27 43.616,15.791 v4(43.616,16.216)
  Layer 2 w0.2: v4(43.616,16.216) 43.055,16.216 42.786,16.486 42.786,18.159 42.83,18.203 46.585,21.959 46.656,22.029 ccw(c46.485,22.201) 46.656,22.372 46.605,22.424 cw(c46.776,22.595) 46.605,22.767 46.691,22.852 cw(c46.862,22.681) 47.034,22.852 47.272,22.615 ccw(c47.443,22.786) 47.615,22.615 47.7,22.7 ccw(c47.529,22.872) 47.7,23.043 47.462,23.281 cw(c47.634,23.453) 47.462,23.624 47.548,23.71 cw(c47.72,23.538) 47.891,23.71 47.943,23.659 ccw(c48.114,23.83) 48.286,23.659 49.248,24.621 49.273,24.646 49.298,24.671 49.298,28.42 50.164,29.286 60.253,29.286 63.45,26.089 v4(63.492,26.089)
  Bottom Layer w0.2: U5.11@59.443,23.106 59.463,23.126 59.463,23.638 61.351,25.527 62.841,25.527 63.403,26.089 v4(63.492,26.089)
LTC2122_CS: R15.1 U6.46 U11.9 | length 28.4
  TopLayer w0.1: v4(35.23,12.84) 35.235,12.84 35.239,12.836 36.696,12.836 37.292,12.24 37.292,11.387 U11.9@37.3,11.379
  TopLayer w0.2: R15.1@30.386,31.016 v1(31.497,31.016)
  Layer 3 w0.2: v1(31.497,31.016) 31.919,31.016 32.196,30.739 32.196,30.252 32.565,29.882 32.565,28.275 32.356,28.065 32.356,21.764 32.881,21.239 ; 32.87,21.227 32.87,18.96 35.23,16.6 v4(35.23,12.84)
  Bottom Layer w0.2: v1(31.497,31.016) 32.311,31.016 32.885,30.442 U6.46@35.217,30.442
LTC_SPI_CLK: U6.45 U11.12 | length 27.6
  TopLayer w0.1: v4(33.049,12.808) 33.093,12.764 33.093,12.554 33.856,11.791 36.041,11.791 36.1,11.732 U11.12@36.1,11.379
  Layer 3 w0.2: v1(31.318,30.302) 30.604,30.302 30.238,29.936 30.238,15.619 33.033,12.824 v4(33.049,12.808)
  Bottom Layer w0.2: v1(31.318,30.302) 32.278,30.302 32.319,30.344 32.721,29.942 U6.45@35.217,29.942
LTC_SPI_MISO: R14.1 U6.43 U11.10 | length 26.9
  TopLayer w0.1: v4(34.519,12.852) 34.519,12.782 34.995,12.305 36.378,12.305 36.9,11.782 U11.10@36.9,11.379
  TopLayer w0.2: R14.1@29.604,28.887 v1(31.497,28.887)
  Layer 3 w0.2: v1(31.497,28.887) 31.856,28.528 31.856,20.879 31.856,20.779 ccw(c32.056,20.779) 32.056,20.579 32.06,20.579 cw(c32.06,20.444) 32.196,20.444 32.196,20.413 cw(c32.06,20.413) 32.06,20.278 32.056,20.278 ccw(c32.056,20.078) 31.856,20.078 31.856,15.61 33.829,13.636 34.294,13.636 34.519,13.411 v4(34.519,12.852)
  Bottom Layer w0.2: v1(31.497,28.887) 35.161,28.887 U6.43@35.217,28.942
LTC_SPI_MOSI: U6.44 U11.11 | length 27.7
  TopLayer w0.1: v4(33.798,12.84) 33.804,12.834 33.804,12.353 34.106,12.051 36.278,12.051 36.5,11.829 U11.11@36.5,11.379
  Layer 3 w0.2: v1(31.98,29.505) 31.074,29.505 30.698,29.129 30.698,26.299 31.054,25.943 31.054,24.79 31.054,21.895 cw(c30.854,21.895) 30.854,21.695 ccw(c30.854,21.513) 30.673,21.513 30.673,21.473 ccw(c30.854,21.473) 30.854,21.292 31.155,21.292 cw(c31.155,21.11) 31.337,21.11 31.337,21.07 cw(c31.155,21.07) 31.155,20.889 30.83,20.889 ccw(c30.83,20.707) 30.649,20.707 30.649,20.667 ccw(c30.83,20.667) 30.83,20.485 30.854,20.485 cw(c30.854,20.285) 31.054,20.285 31.054,20.185 31.054,15.726 33.798,12.982 v4(33.798,12.84)
  Bottom Layer w0.2: v1(31.98,29.505) 35.084,29.505 35.119,29.54 U6.44@35.217,29.442
NetC5_2: C5.2 U2.4 | length 1.3
  TopLayer w0.279: C5.2@5.877,35.524 5.883,35.519 5.883,34.263 U2.4@5.888,34.258
NetC7_2: C7.2 C8.2 FB1.1 R6.2 U3.1 U3.2 | length 6
  TopLayer w0.5: C8.2@8.151,29.095 8.201,29.095 8.786,28.51 8.786,28.046 FB1.1@8.986,27.846 ; R6.2@8.286,26.507 8.286,26.833 8.786,27.333 8.786,27.646 FB1.1@8.986,27.846 ; C7.2@9.101,29.282 FB1.1@9.101,27.961 ; U3.1@10.316,28.007 9.147,28.007 FB1.1@9.101,27.961 ; FB1.1@8.986,27.846 FB1.1@9.101,27.961
NetC11_2: C11.2 C12.2 FB2.1 R8.2 U4.1 U4.2 | length 6.3
  TopLayer w0.25: U4.2@24.484,64.363 24.484,65.3 FB2.1@24.765,65.581 24.965,65.381 24.984,65.362 U4.1@24.984,64.363
  TopLayer w0.5: R8.2@23.507,66.281 23.757,66.031 24.265,66.031 24.715,65.581 FB2.1@24.765,65.581 ; FB2.1@24.965,65.381 25.507,65.381 25.532,65.356 26.152,65.356 C12.2@26.152,66.306
NetC35_2: C35.2 U5.42 | length 1.9
  Bottom Layer w0.2: C35.2@52.861,14.909 52.861,14.914 53.212,15.265 53.452,15.265 53.631,15.444 54.116,15.444 54.295,15.265 54.423,15.265 54.443,15.285 U5.42@54.443,15.306
NetC36_2: C36.2 U5.7 | length 3.5
  Bottom Layer w0.2: U5.7@57.443,23.106 57.423,23.126 57.423,23.375 57.374,23.423 57.374,24.843 58.326,25.794 C36.2@58.326,26.157
NetC37_2: C37.2 U5.5 | length 2
  Bottom Layer w0.2: C37.2@55.918,24.842 55.918,24.5 56.433,23.985 56.433,23.116 U5.5@56.443,23.106
NetC40_1: C40.1 R21.1 | length 1.1
  TopLayer w0.269: R21.1@53.493,39.675 ccw(c53.493,39.793) 53.61,39.793 C40.1@53.61,40.695
NetC41_2: C41.2 R19.1 R21.2 | length 2.1
  TopLayer w0.269: R21.2@53.493,38.775 53.493,37.854 cw(c53.422,37.854) 53.422,37.783 cw(c53.422,37.573) 53.632,37.573 C41.2@53.632,36.873
NetC42_2: C42.2 R20.2 X1.1 | length 4.3
  TopLayer w0.25: C42.2@54.964,50.14 56.669,50.14 56.669,49.234 57.773,48.129 X1.1@57.773,48.029
NetC43_1: C43.1 R22.1 | length 1.1
  TopLayer w0.269: C43.1@54.323,40.695 54.323,39.795 ccw(c54.443,39.795) R22.1@54.443,39.675
NetC44_2: C44.2 R22.2 R23.2 | length 2.1
  TopLayer w0.269: C44.2@54.271,36.873 54.271,37.542 cw(c54.513,37.542) 54.513,37.783 cw(c54.513,37.853) 54.443,37.853 R22.2@54.443,38.775
NetC48_2: C48.2 C167.2 R85.1 | length 1.9
  Bottom Layer w0.268: R85.1@16.154,72.22 C167.2@16.154,74.135
NetC49_1: C49.1 C163.2 U18.1 | length 5.4
  Bottom Layer w0.269: C163.2@18.694,60.079 ccw(c19.744,60.079) 19.744,59.03 C49.1@20.924,59.03 U18.1@23.445,59.03
NetC65_2: C65.2 R54.2 U6.7 | length 4.5
  Bottom Layer w0.268: C65.2@39.133,35.004 ccw(c39.133,35.2) 39.329,35.2 R54.2@39.329,36.122
  Bottom Layer w0.269: U6.7@38.867,32.092 38.867,32.608 cw(c38.956,32.608) 38.956,32.696 ccw(c38.956,33.096) 39.355,33.096 39.355,34.782 ccw(c39.133,34.782) C65.2@39.133,35.004
NetC66_2: C66.2 R52.1 R54.1 R55.2 | length 9.1
  TopLayer w0.269: v1(39.381,40.275) v1(43.658,40.275)
  Bottom Layer w0.268: R54.1@39.329,37.022 39.329,37.56 39.237,37.652 C66.2@39.237,38.196 39.237,40.13 cw(c39.381,40.13) v1(39.381,40.275)
  Bottom Layer w0.269: v1(39.381,40.275) R55.2@40.056,40.275 ; R52.1@42.93,40.275 v1(43.658,40.275)
NetC73_2: C73.2 R96.2 U6.5 | length 5
  TopLayer w0.1: C73.2@37.388,34.288 37.388,34.863 v1(37.598,35.074)
  TopLayer w0.2: R96.2@37.317,33.186 ccw(c37.317,33.228) 37.359,33.228 C73.2@37.359,34.156
  Bottom Layer w0.1: v1(37.598,35.074) 37.598,34.349 37.867,34.079 U6.5@37.867,32.092
NetC74_2: C74.2 U6.6 | length 2.8
  TopLayer w0.1: v1(38.552,33.29) 39.22,33.29 39.381,33.451 39.381,33.938 C74.2@39.449,34.005
  Bottom Layer w0.1: U6.6@38.339,32.121 U6.6@38.367,32.092 38.367,33.093 38.552,33.277 v1(38.552,33.29)
NetC92_1: C92.1 U14.7 | length 1.3
  TopLayer w0.15: C92.1@22.583,13.023 22.583,13.453 22.698,13.568 U14.7@22.698,14.309
NetC111_2: C111.2 C112.2 FB12.2 X1.6 | length 3.6
  TopLayer w0.268: C111.2@57.673,41.379 57.673,42.044 57.673,43.729 X1.6@57.773,43.829 ; C111.2@57.803,41.239 57.803,40.437 FB12.2@58.054,40.186
NetC130_1: C130.1 R100.1 R101.2 U15.16 | length 3.3
  TopLayer w0.2: U15.16@24.445,36.254 24.445,36.442 24.582,36.579 24.824,36.579 25.16,36.915 C130.1@25.16,36.925 25.16,36.935 24.796,37.299 24.796,37.855 24.796,38.929 R101.2@24.845,38.978
NetC142_1: C142.1 R102.1 R103.1 U15.10 | length 3.1
  TopLayer w0.2: U15.10@24.445,32.304 24.445,32.019 24.808,31.656 25.036,31.656 25.086,31.606 C142.1@25.086,31.596 25.086,31.586 24.696,31.196 24.696,30.74 R103.1@24.696,29.791
NetC151_2: C151.2 U15.7 | length 1.7
  TopLayer w0.25: C151.2@22.335,30.822 22.335,30.872 22.945,31.482 U15.7@22.945,32.304
NetC152_2: C152.2 U15.19 | length 1.2
  TopLayer w0.2: U15.19@22.945,36.254 22.945,37.442 C152.2@22.978,37.475
NetC158_2: C158.2 T2.5 | length 1.9
  Bottom Layer w0.268: T2.5@40.248,45.873 40.281,45.906 40.281,47.755 C158.2@40.314,47.788
NetC159_1: C159.1 J6.1 | length 4.2
  Bottom Layer w0.268: C159.1@42.832,75.225 J6.1@47.039,75.225
NetC159_2: C159.2 C186.2 R78.2 | length 2.1
  Bottom Layer w0.268: R78.2@39.692,75.225 C186.2@40.863,75.225 C159.2@41.782,75.225
NetC160_1: C160.1 D8.5 | length 0.9
  Bottom Layer w0.268: C160.1@32.952,75.225 D8.5@33.854,75.225
NetC160_2: C160.2 C187.2 U22.4 | length 2.6
  Bottom Layer w0.268: U22.4@29.337,75.225 C187.2@30.897,75.225 C160.2@31.902,75.225
NetC162_1: C162.1 L6.2 R119.1 | length 2.9
  Bottom Layer w0.3: L6.2@27.119,59.055 27.111,59.047 C162.1@27.111,57.719 27.111,56.193 R119.1@27.12,56.185
NetC163_1: C163.1 FL1.4 | length 2
  Bottom Layer w0.268: C163.1@18.694,61.129 FL1.4@18.694,63.119
NetC164_1: C164.1 R84.1 | length 23.4
  Bottom Layer w0.269: R84.1@29.787,60.325 40.208,60.325 cw(c40.208,57.785) 42.748,57.785 C164.1@42.748,48.755
NetC164_2: C164.2 T2.4 | length 2.1
  Bottom Layer w0.268: T2.4@42.748,45.873 C164.2@42.748,47.975
NetC167_1: C167.1 U19.3 | length 3.5
  Bottom Layer w0.269: C167.1@16.154,75.05 cw(c16.726,75.05) 16.726,75.621 U19.3@19.367,75.621
NetC168_1: C168.1 C169.2 U19.5 | length 2.6
  Bottom Layer w0.269: U19.5@19.767,75.225 C168.1@21.031,75.225 C169.2@22.405,75.225
NetC169_1: C169.1 U22.15 | length 1.9
  Bottom Layer w0.268: C169.1@23.455,75.225 U22.15@25.337,75.225
NetC182_1: C182.1 U22.13 | length 1.9
  Bottom Layer w0.3: C182.1@24.245,73.285 24.245,73.929 24.541,74.225 U22.13@25.337,74.225
NetC183_1: C183.1 U22.11 | length 1.4
  Bottom Layer w0.3: C183.1@26.237,72.22 26.287,72.22 26.587,72.52 U22.11@26.587,73.475
NetC184_1: C184.1 U22.10 | length 1.4
  Bottom Layer w0.3: U22.10@27.087,73.475 27.087,72.955 27.337,72.705 C184.1@27.337,72.22
NetC185_1: C185.1 U22.6 U22.7 U22.8 U22.9
NetD7_1: D7.1 R78.1 | length 1.3
  Bottom Layer w0.268: D7.1@37.49,75.225 R78.1@38.792,75.225
NetD7_6: D7.6 D8.2 | length 1
  Bottom Layer w0.268: D8.2@35.154,75.225 D7.6@36.19,75.225
NetD9_1: D9.1 R120.1 | length 1.7
  TopLayer w0.6: R120.1@15.211,14.299 16.219,14.299 D9.1@16.674,13.844
NetD10_1: D10.1 R122.1 | length 1.8
  TopLayer w0.5: D10.1@29.525,69.305 30.4,70.18 R122.1@30.97,70.18
NetD11_1: D11.1 R121.1 | length 1.3
  TopLayer w0.5: D11.1@2.715,9.825 R121.1@2.715,11.146
NetD12_1: D12.1 R124.1 | length 1.6
  TopLayer w0.5: R124.1@7.339,25.525 7.929,25.525 8.115,25.339 8.626,25.339 D12.1@8.776,25.189
NetD13_1: D13.1 R125.1 | length 1.5
  TopLayer w0.5: D13.1@22.232,65.906 22.54,66.215 R125.1@22.54,67.291
NetFL1_10: FL1.10 R85.2 | length 1.8
  Bottom Layer w0.268: FL1.10@16.154,69.519 R85.2@16.154,71.32
NetJ5_2: J5.2 R78.3 | length 1.6
  TopLayer w0.268: J5.2@39.242,72.87 v1(39.242,73.832)
  Bottom Layer w0.268: v1(39.242,73.832) R78.3@39.242,74.437
NetJ10_2: J10.2 R84.3 | length 0.8
  Bottom Layer w0.268: R84.3@29.337,61.112 v1(29.337,61.894)
NetJ12_2: J12.2 R85.3 | length 1.6
  TopLayer w0.268: J12.2@13.831,71.759 v1(14.714,71.759)
  Bottom Layer w0.268: v1@14.631,71.758 14.637,71.764 15.361,71.764 R85.3@15.367,71.77
NetL6_1: L6.1 R84.2 U18.3 | length 3.8
  Bottom Layer w0.269: U18.3@25.045,60.33 L6.1@27.119,60.33 28.887,60.33 R84.2@28.887,60.325
NetR1_1: R1.1 R3.2 R5.2 | length 2.9
  TopLayer w0.2: R3.2@5.328,23.229 R3.2@5.378,23.229
  TopLayer w0.3: R5.2@3.955,22.47 3.955,21.268 R1.1@3.997,21.226 ; R5.2@4.005,22.47 4.764,23.229 R3.2@5.328,23.229
NetR2_1: R2.1 R4.2 U1.13 | length 3
  TopLayer w0.2: U1.13@11.735,21.594 11.728,21.601 11.728,23.229 R2.1@13.112,23.229
NetR3_1: R3.1 U1.16 | length 2.4
  TopLayer w0.268: R3.1@6.328,23.229 6.919,23.229 7.229,22.919 7.229,21.6 U1.16@7.235,21.594
NetR6_1: R6.1 R7.2 U3.3 | length 2.7
  TopLayer w0.2: R7.2@10.102,25.389 10.052,25.389 9.927,25.514 9.927,25.564 9.286,26.205 R6.1@9.286,26.507 9.786,27.007 U3.3@10.316,27.007
NetR8_1: R8.1 R9.2 U4.3 | length 2.6
  TopLayer w0.2: R9.2@22.432,64.538 R9.2@22.482,64.538 23.05,65.106 23.282,65.106 R8.1@23.482,65.306 ; R8.1@23.482,65.356 R8.1@23.482,65.306 ; U4.3@23.984,64.363 23.984,64.804 R8.1@23.482,65.306
NetR13_1: R13.1 U11.7 | length 12.1
  TopLayer w0.1: v1@36.979,10.633 37.444,10.633 37.54,10.729 37.85,10.729 U11.7@37.9,10.779
  Layer 3 w0.1: v1(28.577,15.216) 28.585,15.208 29.104,15.208 33.679,10.633 v1@37.017,10.633
  Bottom Layer w0.1: v1(28.577,15.216) 28.577,15.413 R13.1@29,15.836
  other v1: 36.885,10.633
NetR16_2: R16.2 U6.3 | length 2.5
  Bottom Layer w0.269: R16.2@35.564,33.963 35.564,33.795 ccw(c35.982,33.795) 35.687,33.5 ccw(c36.024,33.837) 36.024,33.36 36.079,33.36 cw(c36.079,32.877) 36.421,33.219 36.708,32.932 cw(c36.516,32.743) 36.776,32.813 36.848,32.547 U6.3@36.848,32.138
NetR18_2: R18.2 U6.4 | length 2.1
  Bottom Layer w0.269: R18.2@36.613,33.963 ccw(c37.085,33.963) 36.751,33.629 37.046,33.334 cw(c36.269,32.558) 37.367,32.558 U6.4@37.367,32.092
NetR57_2: R57.2 R60.2 U7.11 | length 9.1
  TopLayer w0.2: U7.11@9.967,49.427 9.967,48.021 10.808,47.18 12.766,47.18 13.741,48.154 14.818,48.154 ; R57.2@14.818,47.127 14.818,48.154 ; R60.2@14.818,49.182 14.818,48.154
NetR58_2: R58.2 R61.2 U7.12 | length 9.1
  TopLayer w0.2: U7.12@10.617,49.427 10.638,49.406 10.638,48.389 v1(10.659,48.368) ; R58.2@15.707,47.127 v1(15.707,48.154) R61.2@15.707,49.182
  Layer 2 w0.2: v1(10.659,48.368) 10.659,48.313 11.149,47.823 11.149,47.579 11.266,47.462 14.298,47.462 15.031,48.195 15.525,48.195 15.527,48.193 15.668,48.193 v1(15.707,48.154)